# Altium PCB Lamps_board.PcbDoc (part 2 of 2)
Units mm, origin at the board's own origin, x right, y up, seen from the top; angles counter-clockwise.
Board outline 106 x 36 mm, 2 copper layers (Top Layer, Bottom Layer), stack 1.671 mm thick; 111 components, 90 nets, 292 pads, 89 vias.
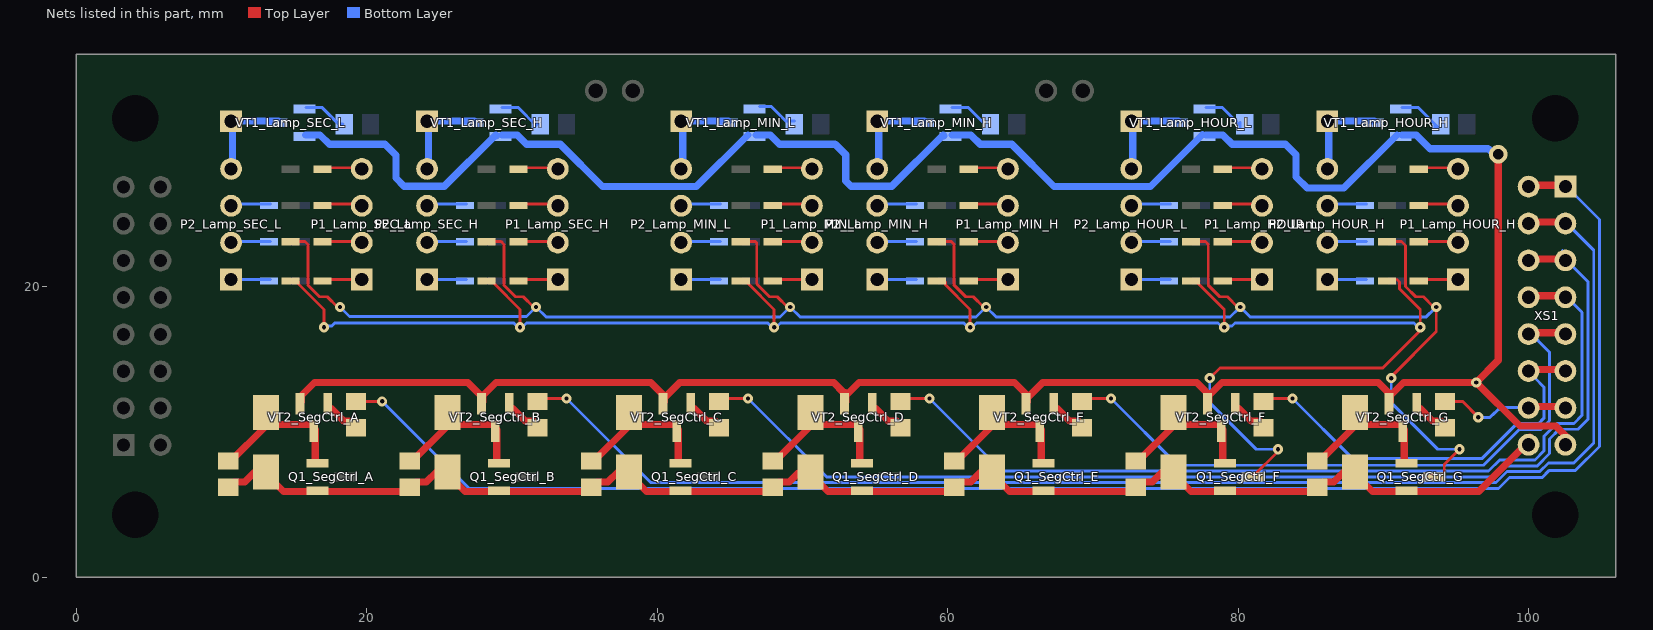
[diagram p2: the nets of this part, all layers, seen from the top]

## Via types
v1: diameter 0.7, hole 0.3, Top Layer to Bottom Layer, 88 vias
v2: diameter 1.27, hole 0.711, Top Layer to Bottom Layer, 1 vias

## Nets (pads, with @x,y where several pads share a name; then routed paths per layer and width w, separated by ;. In a path a pad name is that pad's centre, name@x,y a point inside that pad or via, vN(x,y) a via of type N, cw(c..) or ccw(c..) an arc to the next point about the centre after c; other vN are vias at no path point) (continued)
CTRL_F: D6_Lamp_HOUR_H.2 D6_Lamp_HOUR_L.2 D6_Lamp_MIN_H.2 D6_Lamp_MIN_L.2 D6_Lamp_SEC_H.2 D6_Lamp_SEC_L.2 Q1_SegCtrl_F.3 | length 125.9
  Top Layer w0.2: D6_Lamp_SEC_L.2@15.292,20.368 15.292,20.193 17.05,18.435 v1(17.05,17.21) ; D6_Lamp_SEC_H.2@28.735,20.425 28.735,20.25 30.55,18.435 v1(30.55,17.21) ; D6_Lamp_MIN_L.2@46.248,20.412 46.248,20.237 48.05,18.435 v1(48.05,17.21) ; D6_Lamp_MIN_H.2@59.85,20.31 59.85,20.135 61.55,18.435 v1(61.55,17.21) ; D6_Lamp_HOUR_L.2@77.212,20.388 D6_Lamp_HOUR_L.2@77.288,20.388 ; D6_Lamp_HOUR_L.2@77.314,20.388 D6_Lamp_HOUR_L.2@77.288,20.388 ; v1(78.05,13.71) 78.75,14.41 89.969,14.41 92.55,16.991 v1(92.55,17.21) 92.55,18.435 91.125,19.86 91.125,20.335 90.95,20.51 ; v1(79.05,17.21) 79.05,18.435 77.288,20.197 D6_Lamp_HOUR_L.2@77.288,20.388 ; Q1_SegCtrl_F.3@81.05,6.96 82.75,8.66 v1(82.75,8.81)
  Bottom Layer w0.2: v1(17.05,17.21) 17.146,17.306 17.58,17.306 17.784,17.51 30.115,17.51 v1@30.345,17.279 ; v1(30.55,17.21) 30.685,17.21 30.985,17.51 47.615,17.51 47.915,17.21 v1(48.05,17.21) 48.185,17.21 48.485,17.51 61.115,17.51 61.415,17.21 v1(61.55,17.21) 61.685,17.21 61.985,17.51 78.615,17.51 v1@78.819,17.306 ; v1(78.05,13.71) 78.05,12.01 81.25,8.81 v1(82.75,8.81) ; v1(79.05,17.21) 79.146,17.306 79.58,17.306 79.784,17.51 92.115,17.51 v1@92.345,17.279
CTRL_G: D7_Lamp_HOUR_H.2 D7_Lamp_HOUR_L.2 D7_Lamp_MIN_H.2 D7_Lamp_MIN_L.2 D7_Lamp_SEC_H.2 D7_Lamp_SEC_L.2 Q1_SegCtrl_G.3 | length 133.3
  Top Layer w0.2: D7_Lamp_SEC_L.2@15.25,23.21 15.35,23.11 15.75,23.11 15.95,22.91 15.95,20.101 16.741,19.31 17.269,19.31 17.969,18.61 v1(18.15,18.61) ; D7_Lamp_SEC_H.2@28.75,23.21 28.85,23.11 29.25,23.11 29.45,22.91 29.45,20.101 30.241,19.31 30.769,19.31 31.469,18.61 v1(31.65,18.61) ; D7_Lamp_MIN_L.2@46.25,23.21 46.35,23.11 46.75,23.11 46.85,23.01 46.85,20.201 47.741,19.31 48.269,19.31 48.969,18.61 v1(49.15,18.61) ; D7_Lamp_MIN_H.2@59.75,23.21 59.85,23.11 60.25,23.11 60.45,22.91 60.45,20.101 61.241,19.31 61.769,19.31 62.469,18.61 v1(62.65,18.61) ; D7_Lamp_HOUR_L.2@77.25,23.21 77.35,23.11 77.75,23.11 77.95,22.91 77.95,20.101 78.741,19.31 79.269,19.31 79.969,18.61 v1(80.15,18.61) ; v1(90.55,13.71) 90.55,13.81 93.65,16.91 93.65,18.51 v1@93.75,18.61 ; D7_Lamp_HOUR_H.2@90.75,23.21 90.85,23.11 91.25,23.11 91.525,22.835 91.525,20.026 92.241,19.31 92.769,19.31 93.469,18.61 v1(93.65,18.61) ; Q1_SegCtrl_G.3@93.55,6.96 94,6.96 94.2,7.16 94.2,7.76 v1(95.25,8.81)
  Bottom Layer w0.2: v1(18.15,18.61) 18.8,17.96 31,17.96 v1@31.55,18.51 ; v1(31.65,18.61) 32.35,17.91 48.45,17.91 v1@49.05,18.51 ; v1(49.15,18.61) 49.85,17.91 61.95,17.91 v1(62.65,18.61) 63.35,17.91 79.45,17.91 v1@80.05,18.51 ; v1(80.15,18.61) 80.831,17.929 92.969,17.929 v1@93.55,18.51 ; v1(90.55,13.71) 90.55,12.01 93.75,8.81 v1(95.25,8.81)
CTRL_SEG_A: R2_SegCtrl_A.1 XS1.1 XS1.2 | length 111.2
  Top Layer w0.2: R2_SegCtrl_A.1@19.35,12.21 19.45,12.11 v1(21.05,12.11)
  Top Layer w0.5: XS1.2@100.123,27.001 XS1.1@102.463,27.001
  Bottom Layer w0.2: v1(21.05,12.11) 27.05,6.11 97.55,6.11 97.936,6.11 98.696,6.87 100.951,6.87 101.439,7.358 103.247,7.358 104.898,9.009 104.898,24.63 XS1.1@102.866,26.662 ; XS1.1@102.342,26.742 XS1.1@102.342,27.442 ; XS1.1@102.35,27.21 XS1.1@102.604,26.956
CTRL_SEG_B: R2_SegCtrl_B.1 XS1.3 XS1.4 | length 94.5
  Top Layer w0.2: R2_SegCtrl_B.1@31.85,12.21 31.95,12.31 v1(33.75,12.31)
  Top Layer w0.5: XS1.4@100.123,24.461 XS1.3@102.323,24.461
  Bottom Layer w0.2: v1(33.75,12.31) 39.55,6.51 97.77,6.51 98.53,7.27 100.786,7.27 101.382,7.866 103.12,7.866 104.498,9.244 104.498,22.522 102.644,24.376 XS1.3@102.612,24.376 ; XS1.3@102.382,24.892 XS1.3@102.382,24.996
CTRL_SEG_C: R2_SegCtrl_C.1 XS1.5 XS1.6 | length 78
  Top Layer w0.2: R2_SegCtrl_C.1@44.35,12.21 44.45,12.31 v1(46.25,12.31)
  Top Layer w0.5: XS1.6@100.123,21.921 XS1.5@102.363,21.921
  Bottom Layer w0.2: v1(46.25,12.31) 51.65,6.91 97.426,6.91 98.186,7.67 100.62,7.67 101.46,8.51 101.46,9.517 102.129,10.186 103.408,10.186 104.098,10.876 104.098,20.35 XS1.5@102.739,21.709 ; XS1.5@102.342,22.392 XS1.5@102.342,22.496
CTRL_SEG_D: R2_SegCtrl_D.1 XS1.7 XS1.8 | length 61.8
  Top Layer w0.2: R2_SegCtrl_D.1@56.85,12.21 56.95,12.31 v1(58.75,12.31)
  Top Layer w0.5: XS1.8@100.123,19.381 XS1.7@102.303,19.381
  Bottom Layer w0.2: v1(58.75,12.31) 63.75,7.31 97.26,7.31 98.02,8.07 100.445,8.07 101.06,8.685 101.06,9.683 101.963,10.586 103.136,10.586 103.698,11.148 103.698,18.242 102.898,19.042 XS1.7@102.866,19.042 ; XS1.7@102.242,19.642 XS1.7@102.442,19.642
CTRL_SEG_E: R2_SegCtrl_E.1 XS1.9 XS1.10 | length 44.6
  Top Layer w0.2: R2_SegCtrl_E.1@69.35,12.21 69.45,12.31 v1(71.25,12.31)
  Top Layer w0.5: XS1.10@100.123,16.841 XS1.9@102.503,16.841
  Bottom Layer w0.2: v1(71.25,12.31) 75.85,7.71 96.905,7.71 99.365,10.17 100.852,10.17 101.46,10.778 101.46,15.495 XS1.10@99.95,17.005
CTRL_SEG_F: R2_SegCtrl_F.1 XS1.11 XS1.12 | length 28.9
  Top Layer w0.2: R2_SegCtrl_F.1@81.85,12.21 81.95,12.31 v1(83.75,12.31)
  Top Layer w0.5: XS1.12@100.123,14.301 XS1.11@102.563,14.301
  Bottom Layer w0.2: v1(83.75,12.31) 87.9,8.16 96.789,8.16 99.199,10.57 100.686,10.57 101.06,10.944 101.06,13.101 100.478,13.683 XS1.12@100.478,14.197 ; XS1.12@99.742,14.642 XS1.12@99.742,14.742 ; XS1.12@100.224,14.451 XS1.12@100.478,14.197 ; XS1.12@100.478,14.546 XS1.12@100.478,14.197
CTRL_SEG_G: R2_SegCtrl_G.1 XS1.13 XS1.14 | length 8.8
  Top Layer w0.2: R2_SegCtrl_G.1@94.35,12.21 94.45,12.11 95.45,12.11 v1(96.55,11.01)
  Top Layer w0.5: XS1.14@100.123,11.761 XS1.13@102.623,11.761
  Bottom Layer w0.2: v1(96.55,11.01) 97.347,11.01 98.057,11.676 XS1.14@99.399,11.676 ; XS1.14@99.653,11.905 XS1.14@100.004,12.256
EXT_GND: VT1_Lamp_HOUR_H.2 VT1_Lamp_HOUR_L.2 VT1_Lamp_MIN_H.2 VT1_Lamp_MIN_L.2 VT1_Lamp_SEC_H.2 VT1_Lamp_SEC_L.2 VT2_SegCtrl_A.2 VT2_SegCtrl_B.2 VT2_SegCtrl_C.2 VT2_SegCtrl_D.2 VT2_SegCtrl_E.2 VT2_SegCtrl_F.2 VT2_SegCtrl_G.2 XS1.15 | length 211
  Top Layer w0.5: VT2_SegCtrl_A.2@15.5,12.06 15.5,12.51 16.4,13.41 26.95,13.41 VT2_SegCtrl_B.2@27.95,12.41 ; VT2_SegCtrl_B.2@28,12.06 28,12.51 28.9,13.41 39.55,13.41 VT2_SegCtrl_C.2@40.45,12.51 ; VT2_SegCtrl_C.2@40.5,12.06 40.5,12.36 41.55,13.41 52.15,13.41 52.85,12.71 52.95,12.71 ; VT2_SegCtrl_D.2@53,12.06 53,12.51 53.9,13.41 64.6,13.41 VT2_SegCtrl_E.2@65.5,12.51 ; VT2_SegCtrl_E.2@65.5,12.06 65.5,12.36 66.55,13.41 77.15,13.41 VT2_SegCtrl_F.2@77.95,12.61 ; VT2_SegCtrl_F.2@78,12.06 78,12.51 78.9,13.41 89.65,13.41 VT2_SegCtrl_G.2@90.45,12.61 ; VT2_SegCtrl_G.2@90.5,12.06 90.5,12.51 91.4,13.41 v1(96.41,13.41) ; v2(97.931,29.129) 97.931,14.931 v1(96.41,13.41) ; v2@98.078,29.176 98.178,29.276 v2@98.078,29.276 ; XS1.15@102.631,9.649 101.874,10.406 99.414,10.406 v1(96.41,13.41)
  Bottom Layer w0.5: VT1_Lamp_SEC_L.2@15.8,30.46 16.775,30.46 17.425,29.81 21.25,29.81 22,29.06 22,27.485 22.565,26.92 25.335,26.92 28.875,30.46 VT1_Lamp_SEC_H.2@28.925,30.41 ; VT1_Lamp_SEC_H.2@29.3,30.46 30.35,30.46 31,29.81 33.318,29.81 36.228,26.9 42.69,26.9 VT1_Lamp_MIN_L.2@46.25,30.46 ; VT1_Lamp_MIN_L.2@46.8,30.46 47.775,30.46 48.425,29.81 52.25,29.81 52.975,29.085 52.975,27.285 53.34,26.92 56.16,26.92 59.7,30.46 VT1_Lamp_MIN_H.2@59.75,30.41 ; VT1_Lamp_MIN_H.2@60.3,30.46 61.6,30.46 62.25,29.81 64.412,29.81 67.322,26.9 73.965,26.9 VT1_Lamp_HOUR_L.2@77.547,30.482 ; VT1_Lamp_HOUR_L.2@77.8,30.46 78.95,30.46 79.6,29.81 83.275,29.81 84,29.085 84,27.56 84.76,26.8 87.29,26.8 VT1_Lamp_HOUR_H.2@90.95,30.46 ; VT1_Lamp_HOUR_H.2@91.3,30.46 92.275,30.46 93.225,29.51 97.224,29.51 97.458,29.276 97.784,29.276 v2(97.931,29.129)
EXT_V: Q1_SegCtrl_A.2 Q1_SegCtrl_B.2 Q1_SegCtrl_C.2 Q1_SegCtrl_D.2 Q1_SegCtrl_E.2 Q1_SegCtrl_F.2 Q1_SegCtrl_G.2 R3_SegCtrl_A.2 R3_SegCtrl_B.2 R3_SegCtrl_C.2 R3_SegCtrl_D.2 R3_SegCtrl_E.2 R3_SegCtrl_F.2 R3_SegCtrl_G.2 VD1_SegCtrl_A.2 VD1_SegCtrl_B.2 VD1_SegCtrl_C.2 VD1_SegCtrl_D.2 VD1_SegCtrl_E.2 VD1_SegCtrl_F.2 VD1_SegCtrl_G.2 XS1.16 | length 88.4
  Top Layer w0.2: VD1_SegCtrl_G.2@88.125,7.235 88.1,7.21 88.075,7.21 88.075,7.235 VD1_SegCtrl_G.2@88.15,7.31
  Top Layer w0.5: R3_SegCtrl_A.2@10.55,6.21 10.9,6.56 11.6,6.56 12.25,7.21 VD1_SegCtrl_A.2@13.05,7.21 ; VD1_SegCtrl_A.2@13.65,6.41 13.75,6.41 14.26,5.9 22.44,5.9 R3_SegCtrl_B.2@22.55,6.01 ; R3_SegCtrl_B.2@23.05,6.21 23.4,6.56 24.1,6.56 24.825,7.285 VD1_SegCtrl_B.2@25.5,7.285 ; VD1_SegCtrl_B.2@26.15,6.41 26.25,6.41 26.76,5.9 34.94,5.9 R3_SegCtrl_C.2@35.05,6.01 ; R3_SegCtrl_C.2@35.55,6.21 35.9,6.56 36.6,6.56 37.325,7.285 VD1_SegCtrl_C.2@38.175,7.285 ; VD1_SegCtrl_C.2@38.65,6.41 38.75,6.41 39.26,5.9 47.44,5.9 R3_SegCtrl_D.2@47.55,6.01 ; R3_SegCtrl_D.2@48.05,6.21 48.4,6.56 49.1,6.56 49.7,7.16 VD1_SegCtrl_D.2@50.55,7.16 ; VD1_SegCtrl_D.2@51.15,6.41 51.25,6.41 51.76,5.9 59.84,5.9 R3_SegCtrl_E.2@59.95,6.01 ; R3_SegCtrl_E.2@60.55,6.21 60.9,6.56 61.6,6.56 62.225,7.185 VD1_SegCtrl_E.2@63.15,7.185 ; VD1_SegCtrl_E.2@63.65,6.41 63.75,6.41 64.26,5.9 72.44,5.9 R3_SegCtrl_F.2@72.55,6.01 ; R3_SegCtrl_F.2@73.05,6.21 73.4,6.56 74.1,6.56 VD1_SegCtrl_F.2@74.75,7.21 ; VD1_SegCtrl_F.2@76.15,6.41 76.25,6.41 76.76,5.9 84.94,5.9 R3_SegCtrl_G.2@85.05,6.01 ; R3_SegCtrl_G.2@85.55,6.21 85.9,6.56 86.6,6.56 87.425,7.385 VD1_SegCtrl_G.2@88.15,7.385 ; VD1_SegCtrl_G.2@88.65,6.41 88.75,6.41 89.26,5.9 96.582,5.9 100.091,9.409 XS1.16@100.091,9.649
NetD1_Lamp_HOUR_H_1: D1_Lamp_HOUR_H.1 P2_Lamp_HOUR_H.1 | length 2.4
  Bottom Layer w0.2: P2_Lamp_HOUR_H.1@86.45,20.41 86.55,20.51 D1_Lamp_HOUR_H.1@88.85,20.51
NetD1_Lamp_HOUR_L_1: D1_Lamp_HOUR_L.1 P2_Lamp_HOUR_L.1 | length 2.4
  Bottom Layer w0.2: P2_Lamp_HOUR_L.1@72.95,20.41 73.05,20.51 D1_Lamp_HOUR_L.1@75.35,20.51
NetD1_Lamp_MIN_H_1: D1_Lamp_MIN_H.1 P2_Lamp_MIN_H.1 | length 2.4
  Bottom Layer w0.2: P2_Lamp_MIN_H.1@55.45,20.41 55.55,20.51 D1_Lamp_MIN_H.1@57.85,20.51
NetD1_Lamp_MIN_L_1: D1_Lamp_MIN_L.1 P2_Lamp_MIN_L.1 | length 2.4
  Bottom Layer w0.2: P2_Lamp_MIN_L.1@41.95,20.41 42.05,20.51 D1_Lamp_MIN_L.1@44.35,20.51
NetD1_Lamp_SEC_H_1: D1_Lamp_SEC_H.1 P2_Lamp_SEC_H.1 | length 2.4
  Bottom Layer w0.2: P2_Lamp_SEC_H.1@24.45,20.41 24.55,20.51 D1_Lamp_SEC_H.1@26.85,20.51
NetD1_Lamp_SEC_L_1: D1_Lamp_SEC_L.1 P2_Lamp_SEC_L.1 | length 2.4
  Bottom Layer w0.2: P2_Lamp_SEC_L.1@10.95,20.41 11.05,20.51 D1_Lamp_SEC_L.1@13.35,20.51
NetD2_Lamp_HOUR_H_1: D2_Lamp_HOUR_H.1 P2_Lamp_HOUR_H.3 | length 2.4
  Bottom Layer w0.2: P2_Lamp_HOUR_H.3@86.45,25.71 86.47,25.69 88.83,25.69 D2_Lamp_HOUR_H.1@88.85,25.71
NetD2_Lamp_HOUR_L_1: D2_Lamp_HOUR_L.1 P2_Lamp_HOUR_L.3 | length 2.4
  Bottom Layer w0.2: P2_Lamp_HOUR_L.3@72.95,25.71 72.97,25.69 75.33,25.69 D2_Lamp_HOUR_L.1@75.35,25.71
NetD2_Lamp_MIN_H_1: D2_Lamp_MIN_H.1 P2_Lamp_MIN_H.3 | length 2.4
  Bottom Layer w0.2: P2_Lamp_MIN_H.3@55.45,25.71 55.47,25.69 57.83,25.69 D2_Lamp_MIN_H.1@57.85,25.71
NetD2_Lamp_MIN_L_1: D2_Lamp_MIN_L.1 P2_Lamp_MIN_L.3 | length 2.4
  Bottom Layer w0.2: P2_Lamp_MIN_L.3@41.95,25.71 41.97,25.69 44.33,25.69 D2_Lamp_MIN_L.1@44.35,25.71
NetD2_Lamp_SEC_H_1: D2_Lamp_SEC_H.1 P2_Lamp_SEC_H.3 | length 2.4
  Bottom Layer w0.2: P2_Lamp_SEC_H.3@24.45,25.71 24.47,25.69 26.83,25.69 D2_Lamp_SEC_H.1@26.85,25.71
NetD2_Lamp_SEC_L_1: D2_Lamp_SEC_L.1 P2_Lamp_SEC_L.3 | length 2.4
  Bottom Layer w0.2: P2_Lamp_SEC_L.3@10.95,25.71 10.97,25.69 13.33,25.69 D2_Lamp_SEC_L.1@13.35,25.71
NetD3_Lamp_HOUR_H_1: D3_Lamp_HOUR_H.1 P2_Lamp_HOUR_H.2 | length 2.1
  Bottom Layer w0.2: P2_Lamp_HOUR_H.2@86.75,23.21 86.84,23.12 88.84,23.12 D3_Lamp_HOUR_H.1@88.85,23.11
NetD3_Lamp_HOUR_L_1: D3_Lamp_HOUR_L.1 P2_Lamp_HOUR_L.2 | length 2.1
  Bottom Layer w0.2: P2_Lamp_HOUR_L.2@73.25,23.21 73.34,23.12 75.34,23.12 D3_Lamp_HOUR_L.1@75.35,23.11
NetD3_Lamp_MIN_H_1: D3_Lamp_MIN_H.1 P2_Lamp_MIN_H.2 | length 2.1
  Bottom Layer w0.2: P2_Lamp_MIN_H.2@55.75,23.21 55.84,23.12 57.84,23.12 D3_Lamp_MIN_H.1@57.85,23.11
NetD3_Lamp_MIN_L_1: D3_Lamp_MIN_L.1 P2_Lamp_MIN_L.2 | length 2.1
  Bottom Layer w0.2: P2_Lamp_MIN_L.2@42.25,23.21 42.34,23.12 44.34,23.12 D3_Lamp_MIN_L.1@44.35,23.11
NetD3_Lamp_SEC_H_1: D3_Lamp_SEC_H.1 P2_Lamp_SEC_H.2 | length 2.1
  Bottom Layer w0.2: P2_Lamp_SEC_H.2@24.75,23.21 24.84,23.12 26.84,23.12 D3_Lamp_SEC_H.1@26.85,23.11
NetD3_Lamp_SEC_L_1: D3_Lamp_SEC_L.1 P2_Lamp_SEC_L.2 | length 2.1
  Bottom Layer w0.2: P2_Lamp_SEC_L.2@11.25,23.21 11.34,23.12 13.34,23.12 D3_Lamp_SEC_L.1@13.35,23.11
NetD4_Lamp_HOUR_H_1: D4_Lamp_HOUR_H.1 P1_Lamp_HOUR_H.3 | length 2.1
  Top Layer w0.2: D4_Lamp_HOUR_H.1@92.58,25.68 92.55,25.71 P1_Lamp_HOUR_H.3@94.55,25.71 ; P1_Lamp_HOUR_H.3@94.65,25.681 P1_Lamp_HOUR_H.3@94.65,25.71
NetD4_Lamp_HOUR_L_1: D4_Lamp_HOUR_L.1 P1_Lamp_HOUR_L.3 | length 2.1
  Top Layer w0.2: D4_Lamp_HOUR_L.1@79.08,25.68 79.05,25.71 P1_Lamp_HOUR_L.3@81.05,25.71 ; P1_Lamp_HOUR_L.3@81.15,25.681 P1_Lamp_HOUR_L.3@81.15,25.71
NetD4_Lamp_MIN_H_1: D4_Lamp_MIN_H.1 P1_Lamp_MIN_H.3 | length 2.1
  Top Layer w0.2: D4_Lamp_MIN_H.1@61.58,25.68 61.55,25.71 P1_Lamp_MIN_H.3@63.55,25.71 ; P1_Lamp_MIN_H.3@63.65,25.681 P1_Lamp_MIN_H.3@63.65,25.71
NetD4_Lamp_MIN_L_1: D4_Lamp_MIN_L.1 P1_Lamp_MIN_L.3 | length 2.1
  Top Layer w0.2: D4_Lamp_MIN_L.1@48.08,25.68 48.05,25.71 P1_Lamp_MIN_L.3@50.05,25.71 ; P1_Lamp_MIN_L.3@50.15,25.681 P1_Lamp_MIN_L.3@50.15,25.71
NetD4_Lamp_SEC_H_1: D4_Lamp_SEC_H.1 P1_Lamp_SEC_H.3 | length 2.1
  Top Layer w0.2: D4_Lamp_SEC_H.1@30.58,25.68 30.55,25.71 P1_Lamp_SEC_H.3@32.55,25.71 ; P1_Lamp_SEC_H.3@32.65,25.681 P1_Lamp_SEC_H.3@32.65,25.71
NetD4_Lamp_SEC_L_1: D4_Lamp_SEC_L.1 P1_Lamp_SEC_L.3 | length 2.1
  Top Layer w0.2: D4_Lamp_SEC_L.1@17.08,25.68 17.05,25.71 P1_Lamp_SEC_L.3@19.05,25.71 ; P1_Lamp_SEC_L.3@19.15,25.681 P1_Lamp_SEC_L.3@19.15,25.71
NetD5_Lamp_HOUR_H_1: D5_Lamp_HOUR_H.1 P1_Lamp_HOUR_H.4 | length 2.1
  Top Layer w0.2: D5_Lamp_HOUR_H.1@92.55,28.21 92.56,28.2 94.649,28.2 P1_Lamp_HOUR_H.4@94.65,28.21
NetD5_Lamp_HOUR_L_1: D5_Lamp_HOUR_L.1 P1_Lamp_HOUR_L.4 | length 2.1
  Top Layer w0.2: D5_Lamp_HOUR_L.1@79.05,28.21 79.06,28.2 P1_Lamp_HOUR_L.4@81.149,28.2 ; P1_Lamp_HOUR_L.4@81.15,28.201 P1_Lamp_HOUR_L.4@81.15,28.21
NetD5_Lamp_MIN_H_1: D5_Lamp_MIN_H.1 P1_Lamp_MIN_H.4 | length 2.1
  Top Layer w0.2: D5_Lamp_MIN_H.1@61.55,28.21 61.56,28.2 63.649,28.2 P1_Lamp_MIN_H.4@63.65,28.21
NetD5_Lamp_MIN_L_1: D5_Lamp_MIN_L.1 P1_Lamp_MIN_L.4 | length 2.1
  Top Layer w0.2: D5_Lamp_MIN_L.1@48.05,28.21 48.06,28.2 50.149,28.2 P1_Lamp_MIN_L.4@50.15,28.21
NetD5_Lamp_SEC_H_1: D5_Lamp_SEC_H.1 P1_Lamp_SEC_H.4 | length 2.1
  Top Layer w0.2: D5_Lamp_SEC_H.1@30.55,28.21 30.56,28.2 P1_Lamp_SEC_H.4@32.649,28.2 ; P1_Lamp_SEC_H.4@32.65,28.201 P1_Lamp_SEC_H.4@32.65,28.21
NetD5_Lamp_SEC_L_1: D5_Lamp_SEC_L.1 P1_Lamp_SEC_L.4 | length 2.1
  Top Layer w0.2: D5_Lamp_SEC_L.1@17.05,28.21 17.06,28.2 P1_Lamp_SEC_L.4@19.149,28.2 ; P1_Lamp_SEC_L.4@19.15,28.201 P1_Lamp_SEC_L.4@19.15,28.21
NetD6_Lamp_HOUR_H_1: D6_Lamp_HOUR_H.1 P1_Lamp_HOUR_H.1 | length 2.1
  Top Layer w0.2: D6_Lamp_HOUR_H.1@92.55,20.51 P1_Lamp_HOUR_H.1@94.65,20.51
NetD6_Lamp_HOUR_L_1: D6_Lamp_HOUR_L.1 P1_Lamp_HOUR_L.1 | length 2.1
  Top Layer w0.2: D6_Lamp_HOUR_L.1@79.05,20.51 P1_Lamp_HOUR_L.1@81.15,20.51
NetD6_Lamp_MIN_H_1: D6_Lamp_MIN_H.1 P1_Lamp_MIN_H.1 | length 2.1
  Top Layer w0.2: D6_Lamp_MIN_H.1@61.55,20.51 P1_Lamp_MIN_H.1@63.65,20.51
NetD6_Lamp_MIN_L_1: D6_Lamp_MIN_L.1 P1_Lamp_MIN_L.1 | length 2.1
  Top Layer w0.2: D6_Lamp_MIN_L.1@48.05,20.51 P1_Lamp_MIN_L.1@50.15,20.51
NetD6_Lamp_SEC_H_1: D6_Lamp_SEC_H.1 P1_Lamp_SEC_H.1 | length 2.1
  Top Layer w0.2: D6_Lamp_SEC_H.1@30.55,20.51 P1_Lamp_SEC_H.1@32.65,20.51
NetD6_Lamp_SEC_L_1: D6_Lamp_SEC_L.1 P1_Lamp_SEC_L.1 | length 2.1
  Top Layer w0.2: D6_Lamp_SEC_L.1@17.05,20.51 P1_Lamp_SEC_L.1@19.15,20.51
NetD7_Lamp_HOUR_H_1: D7_Lamp_HOUR_H.1 P1_Lamp_HOUR_H.2 | length 2.1
  Top Layer w0.2: D7_Lamp_HOUR_H.1@92.55,23.11 P1_Lamp_HOUR_H.2@94.65,23.11
NetD7_Lamp_HOUR_L_1: D7_Lamp_HOUR_L.1 P1_Lamp_HOUR_L.2 | length 2.1
  Top Layer w0.2: D7_Lamp_HOUR_L.1@79.05,23.11 P1_Lamp_HOUR_L.2@81.15,23.11
NetD7_Lamp_MIN_H_1: D7_Lamp_MIN_H.1 P1_Lamp_MIN_H.2 | length 2.1
  Top Layer w0.2: D7_Lamp_MIN_H.1@61.55,23.11 P1_Lamp_MIN_H.2@63.65,23.11
NetD7_Lamp_MIN_L_1: D7_Lamp_MIN_L.1 P1_Lamp_MIN_L.2 | length 2.1
  Top Layer w0.2: D7_Lamp_MIN_L.1@48.05,23.11 P1_Lamp_MIN_L.2@50.15,23.11
NetD7_Lamp_SEC_H_1: D7_Lamp_SEC_H.1 P1_Lamp_SEC_H.2 | length 2.1
  Top Layer w0.2: D7_Lamp_SEC_H.1@30.55,23.11 P1_Lamp_SEC_H.2@32.65,23.11
NetD7_Lamp_SEC_L_1: D7_Lamp_SEC_L.1 P1_Lamp_SEC_L.2 | length 2.1
  Top Layer w0.2: D7_Lamp_SEC_L.1@17.05,23.11 P1_Lamp_SEC_L.2@19.15,23.11
NetJ1_Lamp_HOUR_H_1: J1_Lamp_HOUR_H.1 P2_Lamp_HOUR_H.4 VT1_Lamp_HOUR_H.3 | length 6.4
  Bottom Layer w0.2: J1_Lamp_HOUR_H.1@86.15,31.51 J1_Lamp_HOUR_H.1@86.25,31.41 ; J1_Lamp_HOUR_H.1@86.35,31.51 J1_Lamp_HOUR_H.1@86.45,31.41
  Bottom Layer w0.5: P2_Lamp_HOUR_H.4@86.25,28.21 J1_Lamp_HOUR_H.1@86.25,31.41 ; J1_Lamp_HOUR_H.1@86.45,31.41 VT1_Lamp_HOUR_H.3@89.4,31.41
NetJ1_Lamp_HOUR_L_1: J1_Lamp_HOUR_L.1 P2_Lamp_HOUR_L.4 VT1_Lamp_HOUR_L.3 | length 6.4
  Bottom Layer w0.2: J1_Lamp_HOUR_L.1@72.65,31.51 J1_Lamp_HOUR_L.1@72.75,31.41 ; J1_Lamp_HOUR_L.1@72.85,31.51 J1_Lamp_HOUR_L.1@72.95,31.41
  Bottom Layer w0.5: P2_Lamp_HOUR_L.4@72.75,28.21 J1_Lamp_HOUR_L.1@72.75,31.41 ; J1_Lamp_HOUR_L.1@72.95,31.41 VT1_Lamp_HOUR_L.3@75.9,31.41
NetJ1_Lamp_MIN_H_1: J1_Lamp_MIN_H.1 P2_Lamp_MIN_H.4 VT1_Lamp_MIN_H.3 | length 6.4
  Bottom Layer w0.2: J1_Lamp_MIN_H.1@55.15,31.51 J1_Lamp_MIN_H.1@55.25,31.41 ; J1_Lamp_MIN_H.1@55.35,31.51 J1_Lamp_MIN_H.1@55.45,31.41
  Bottom Layer w0.5: P2_Lamp_MIN_H.4@55.25,28.21 J1_Lamp_MIN_H.1@55.25,31.41 ; J1_Lamp_MIN_H.1@55.45,31.41 VT1_Lamp_MIN_H.3@58.4,31.41
NetJ1_Lamp_MIN_L_1: J1_Lamp_MIN_L.1 P2_Lamp_MIN_L.4 VT1_Lamp_MIN_L.3 | length 6.4
  Bottom Layer w0.2: J1_Lamp_MIN_L.1@41.65,31.51 J1_Lamp_MIN_L.1@41.75,31.41 ; J1_Lamp_MIN_L.1@41.85,31.51 J1_Lamp_MIN_L.1@41.95,31.41
  Bottom Layer w0.5: P2_Lamp_MIN_L.4@41.75,28.21 J1_Lamp_MIN_L.1@41.75,31.41 ; J1_Lamp_MIN_L.1@41.95,31.41 VT1_Lamp_MIN_L.3@44.9,31.41
NetJ1_Lamp_SEC_H_1: J1_Lamp_SEC_H.1 P2_Lamp_SEC_H.4 VT1_Lamp_SEC_H.3 | length 6.1
  Bottom Layer w0.5: P2_Lamp_SEC_H.4@24.25,28.21 J1_Lamp_SEC_H.1@24.25,31.41 ; J1_Lamp_SEC_H.1@24.45,31.41 VT1_Lamp_SEC_H.3@27.4,31.41
NetJ1_Lamp_SEC_L_1: J1_Lamp_SEC_L.1 P2_Lamp_SEC_L.4 VT1_Lamp_SEC_L.3 | length 6.4
  Bottom Layer w0.2: J1_Lamp_SEC_L.1@10.65,31.51 J1_Lamp_SEC_L.1@10.75,31.41 ; J1_Lamp_SEC_L.1@10.85,31.51 J1_Lamp_SEC_L.1@10.95,31.41
  Bottom Layer w0.5: P2_Lamp_SEC_L.4@10.75,28.21 J1_Lamp_SEC_L.1@10.75,31.41 ; J1_Lamp_SEC_L.1@10.95,31.41 12.45,31.41 VT1_Lamp_SEC_L.3@13.9,31.41
NetQ1_SegCtrl_A_1: Q1_SegCtrl_A.1 R3_SegCtrl_A.1 VD1_SegCtrl_A.1 VT2_SegCtrl_A.3 | length 9.2
  Top Layer w0.5: R3_SegCtrl_A.1@10.55,8.01 10.65,8.01 VD1_SegCtrl_A.1@12.95,10.31 ; VD1_SegCtrl_A.1@13.05,11.11 13.15,11.21 13.15,11.16 13.8,10.51 VT2_SegCtrl_A.3@16.35,10.51 ; Q1_SegCtrl_A.1@16.45,8.01 VT2_SegCtrl_A.3@16.45,10.16
NetQ1_SegCtrl_B_1: Q1_SegCtrl_B.1 R3_SegCtrl_B.1 VD1_SegCtrl_B.1 VT2_SegCtrl_B.3 | length 9
  Top Layer w0.5: R3_SegCtrl_B.1@23.15,8.01 VD1_SegCtrl_B.1@25.45,10.31 ; VD1_SegCtrl_B.1@25.55,11.11 VD1_SegCtrl_B.1@25.65,11.21 ; VD1_SegCtrl_B.1@25.65,11.16 26.3,10.51 VT2_SegCtrl_B.3@28.85,10.51 ; Q1_SegCtrl_B.1@28.95,8.01 VT2_SegCtrl_B.3@28.95,10.16
NetQ1_SegCtrl_C_1: Q1_SegCtrl_C.1 R3_SegCtrl_C.1 VD1_SegCtrl_C.1 VT2_SegCtrl_C.3 | length 9
  Top Layer w0.5: R3_SegCtrl_C.1@35.65,8.01 VD1_SegCtrl_C.1@37.95,10.31 ; VD1_SegCtrl_C.1@38.05,11.11 VD1_SegCtrl_C.1@38.15,11.21 ; VD1_SegCtrl_C.1@38.15,11.16 38.8,10.51 VT2_SegCtrl_C.3@41.35,10.51 ; Q1_SegCtrl_C.1@41.45,8.01 VT2_SegCtrl_C.3@41.45,10.16
NetQ1_SegCtrl_D_1: Q1_SegCtrl_D.1 R3_SegCtrl_D.1 VD1_SegCtrl_D.1 VT2_SegCtrl_D.3 | length 9
  Top Layer w0.5: R3_SegCtrl_D.1@48.15,8.01 VD1_SegCtrl_D.1@50.45,10.31 ; VD1_SegCtrl_D.1@50.55,11.11 VD1_SegCtrl_D.1@50.65,11.21 ; VD1_SegCtrl_D.1@50.65,11.16 51.3,10.51 VT2_SegCtrl_D.3@53.85,10.51 ; Q1_SegCtrl_D.1@53.95,8.01 VT2_SegCtrl_D.3@53.95,10.16
NetQ1_SegCtrl_E_1: Q1_SegCtrl_E.1 R3_SegCtrl_E.1 VD1_SegCtrl_E.1 VT2_SegCtrl_E.3 | length 9
  Top Layer w0.5: R3_SegCtrl_E.1@60.65,8.01 VD1_SegCtrl_E.1@62.95,10.31 ; VD1_SegCtrl_E.1@63.05,11.11 VD1_SegCtrl_E.1@63.15,11.21 ; VD1_SegCtrl_E.1@63.15,11.16 63.8,10.51 VT2_SegCtrl_E.3@66.35,10.51 ; Q1_SegCtrl_E.1@66.45,8.01 VT2_SegCtrl_E.3@66.45,10.16
NetQ1_SegCtrl_F_1: Q1_SegCtrl_F.1 R3_SegCtrl_F.1 VD1_SegCtrl_F.1 VT2_SegCtrl_F.3 | length 9
  Top Layer w0.5: R3_SegCtrl_F.1@73.15,8.01 VD1_SegCtrl_F.1@75.45,10.31 ; VD1_SegCtrl_F.1@75.55,11.11 VD1_SegCtrl_F.1@75.65,11.21 ; VD1_SegCtrl_F.1@75.65,11.16 76.3,10.51 VT2_SegCtrl_F.3@78.85,10.51 ; Q1_SegCtrl_F.1@78.95,8.01 VT2_SegCtrl_F.3@78.95,10.16
NetQ1_SegCtrl_G_1: Q1_SegCtrl_G.1 R3_SegCtrl_G.1 VD1_SegCtrl_G.1 VT2_SegCtrl_G.3 | length 9
  Top Layer w0.5: R3_SegCtrl_G.1@85.65,8.01 VD1_SegCtrl_G.1@87.95,10.31 ; VD1_SegCtrl_G.1@88.05,11.11 VD1_SegCtrl_G.1@88.15,11.21 ; VD1_SegCtrl_G.1@88.15,11.16 88.8,10.51 VT2_SegCtrl_G.3@91.35,10.51 ; Q1_SegCtrl_G.1@91.45,8.01 VT2_SegCtrl_G.3@91.45,10.16
NetR1_Lamp_HOUR_H_2: R1_Lamp_HOUR_H.2 VT1_Lamp_HOUR_H.1 | length 3.4
  Bottom Layer w0.2: VT1_Lamp_HOUR_H.1@91.3,32.36 92.4,32.36 93.75,31.01 93.55,31.01 R1_Lamp_HOUR_H.2@93.55,31.21
NetR1_Lamp_HOUR_L_2: R1_Lamp_HOUR_L.2 VT1_Lamp_HOUR_L.1 | length 3.1
  Bottom Layer w0.2: VT1_Lamp_HOUR_L.1@77.8,32.36 78.9,32.36 80.05,31.21 80.15,31.11 R1_Lamp_HOUR_L.2@80.15,31.01 ; R1_Lamp_HOUR_L.2@80.15,31.21 R1_Lamp_HOUR_L.2@80.15,31.31
NetR1_Lamp_MIN_H_2: R1_Lamp_MIN_H.2 VT1_Lamp_MIN_H.1 | length 2.6
  Bottom Layer w0.2: VT1_Lamp_MIN_H.1@60.3,32.36 61.4,32.36 R1_Lamp_MIN_H.2@62.45,31.31
NetR1_Lamp_MIN_L_2: R1_Lamp_MIN_L.2 VT1_Lamp_MIN_L.1 | length 2.8
  Bottom Layer w0.2: VT1_Lamp_MIN_L.1@47.05,32.41 47.85,32.41 48.85,31.41 R1_Lamp_MIN_L.2@49.45,31.41
NetR1_Lamp_SEC_H_2: R1_Lamp_SEC_H.2 VT1_Lamp_SEC_H.1 | length 3.4
  Bottom Layer w0.2: VT1_Lamp_SEC_H.1@29.3,32.36 30.4,32.36 31.65,31.11 31.85,31.31 R1_Lamp_SEC_H.2@31.65,31.31
NetR1_Lamp_SEC_L_2: R1_Lamp_SEC_L.2 VT1_Lamp_SEC_L.1 | length 3.4
  Bottom Layer w0.2: VT1_Lamp_SEC_L.1@15.8,32.36 16.9,32.36 18.2,31.06 18.35,31.21 R1_Lamp_SEC_L.2@18.15,31.21
NetR2_SegCtrl_A_2: R2_SegCtrl_A.2 VT2_SegCtrl_A.1 | length 2.3
  Top Layer w0.5: VT2_SegCtrl_A.1@17.55,11.61 18.4,10.76 19,10.76 R2_SegCtrl_A.2@19.35,10.41
NetR2_SegCtrl_B_2: R2_SegCtrl_B.2 VT2_SegCtrl_B.1 | length 2.3
  Top Layer w0.5: VT2_SegCtrl_B.1@30.05,11.61 30.9,10.76 31.5,10.76 R2_SegCtrl_B.2@31.85,10.41
NetR2_SegCtrl_C_2: R2_SegCtrl_C.2 VT2_SegCtrl_C.1 | length 2.3
  Top Layer w0.5: VT2_SegCtrl_C.1@42.55,11.61 43.4,10.76 44,10.76 R2_SegCtrl_C.2@44.35,10.41
NetR2_SegCtrl_D_2: R2_SegCtrl_D.2 VT2_SegCtrl_D.1 | length 2.3
  Top Layer w0.5: VT2_SegCtrl_D.1@55.05,11.61 55.9,10.76 56.5,10.76 R2_SegCtrl_D.2@56.85,10.41
NetR2_SegCtrl_E_2: R2_SegCtrl_E.2 VT2_SegCtrl_E.1 | length 2.3
  Top Layer w0.5: VT2_SegCtrl_E.1@67.55,11.61 68.4,10.76 69,10.76 R2_SegCtrl_E.2@69.35,10.41
NetR2_SegCtrl_F_2: R2_SegCtrl_F.2 VT2_SegCtrl_F.1 | length 2.3
  Top Layer w0.5: VT2_SegCtrl_F.1@80.05,11.61 80.9,10.76 81.5,10.76 R2_SegCtrl_F.2@81.85,10.41
NetR2_SegCtrl_G_2: R2_SegCtrl_G.2 VT2_SegCtrl_G.1 | length 2.3
  Top Layer w0.5: VT2_SegCtrl_G.1@92.55,11.61 93.4,10.76 94,10.76 R2_SegCtrl_G.2@94.35,10.41
pads on no net: J1.1 J1.2 J2.1 J2.2 XS2.13 XS2.14 XS2.15 XS2.16

## Keep-outs
Keep-Out Layer:
  the board outline again, w0.2

## Silkscreen, mask and mechanical layers (free items; w line width, h text height)
Top Overlay:
  lines w0.2: 2.077,12.967 7.1,12.967 ; 2.077,15.467 7.1,15.467 ; 2.077,18.067 7.1,18.067 ; 2.077,20.567 7.1,20.567 ; 2.077,23.067 7.1,23.067 ; 2.1,10.4 7.1,10.4 ; 98.704,10.469 103.804,10.469 ; 98.704,12.969 103.804,12.969 ; 98.704,15.569 103.804,15.569 ; 98.704,18.069 103.804,18.069 ; 98.704,20.669 103.804,20.669 ; 98.704,23.169 103.804,23.169 ; 98.704,25.669 103.804,25.669 ; 101.352,7.942 101.352,10.469 ; 21.25,17.91 21.25,33.21 8.35,33.21 8.35,17.91 21.25,17.91 ; 21.25,17.91 21.25,17.91 ; 2.077,7.667 7.1,7.667 7.1,27.967 2.077,27.967 2.077,7.667 ; 9.35,4.91 20.65,4.91 20.65,14.21 9.35,14.21 9.35,4.91 ; 21.85,4.91 33.15,4.91 33.15,14.21 21.85,14.21 21.85,4.91 ; 21.85,17.91 21.85,33.21 34.75,33.21 34.75,17.91 21.85,17.91 ; 34.35,4.91 45.65,4.91 45.65,14.21 34.35,14.21 34.35,4.91 ; 39.35,17.91 39.35,33.21 52.25,33.21 52.25,17.91 39.35,17.91 ; 46.85,4.91 58.15,4.91 58.15,14.21 46.85,14.21 46.85,4.91 ; 52.85,17.91 52.85,33.21 65.75,33.21 65.75,17.91 52.85,17.91 ; 59.35,4.91 70.65,4.91 70.65,14.21 59.35,14.21 59.35,4.91 ; 70.35,17.91 70.35,33.21 83.25,33.21 83.25,17.91 70.35,17.91 ; 71.85,4.91 83.15,4.91 83.15,14.21 71.85,14.21 71.85,4.91 ; 83.85,17.91 83.85,33.21 96.75,33.21 96.75,17.91 83.85,17.91 ; 84.35,4.91 95.65,4.91 95.65,14.21 84.35,14.21 84.35,4.91 ; 98.704,7.866 98.704,27.969 98.704,28.237 103.804,28.237 103.804,27.969 103.804,7.866 98.704,7.866
  text "LAMP / SEC L" at 17.25,32.51 h2 r180
  text "LAMP / SEC H" at 30.75,32.51 h2 r180
  text "LAMP / MIN L" at 48.25,32.51 h2 r180
  text "LAMP / MIN H" at 61.75,32.51 h2 r180
  text "LAMP / HOUR L" at 80,32.51 h2 r180
  text "LAMP / HOUR H" at 93.6,32.51 h2 r180
  text "Digit Ctrl" at 21.55,31.91 h1.5 r180
  text "Digit Ctrl" at 35.05,31.91 h1.5 r180
  text "Digit Ctrl" at 52.55,31.91 h1.5 r180
  text "Digit Ctrl" at 66.05,31.91 h1.5 r180
  text "Digit Ctrl" at 83.55,31.91 h1.5 r180
  text "Digit Ctrl" at 97.05,31.91 h1.5 r180
  text "Segment Ctrl" at 104.4,27.9 h2 r270
  text "A" at 97.7,27.3 h1.5 r270
  text "B" at 97.7,24.7 h1.5 r270
  text "Digit Ctrl" at 1.6,24.4 h2 r90
  text "NONE" at 8.1,24.2 h1.5 r90
  text "C" at 97.7,22.3 h1.5 r270
  text "SEC L" at 1.6,20.6 h1.5 r90
  text "D" at 97.7,19.6 h1.5 r270
  text "SEC H" at 8.1,18 h1.5 r90
  text "E" at 97.7,17.1 h1.5 r270
  text "MIN L" at 1.7,15.7 h1.5 r90
  text "F" at 97.7,14.7 h1.5 r270
  text "Segment A" at 15.1,13.8 h1.5 r180
  text "Segment B" at 27.6,13.8 h1.5 r180
  text "Segment C" at 40.1,13.8 h1.5 r180
  text "Segment D" at 52.6,13.8 h1.5 r180
  text "Segment E" at 65.1,13.8 h1.5 r180
  text "Segment F" at 77.6,13.8 h1.5 r180
  text "Segment G" at 90.1,13.8 h1.5 r180
  text "MIN H" at 8.1,12.8 h1.5 r90
  text "G" at 97.7,12.2 h1.5 r270
  text "GND" at 104.1,10.2 h1.5 r270
  text "HOUR L" at 1.7,10 h1.5 r90
  text "+V" at 97.7,10 h1.5 r270
  text "HOUR H" at 8.1,6.5 h1.5 r90
Bottom Overlay:
  lines w0.2: 21.25,17.91 8.35,17.91 8.35,33.21 21.25,33.21 21.25,17.91 ; 21.25,17.91 21.25,17.91 ; 9.35,4.91 20.65,4.91 20.65,14.21 9.35,14.21 9.35,4.91 ; 21.85,4.91 33.15,4.91 33.15,14.21 21.85,14.21 21.85,4.91 ; 21.85,17.91 34.75,17.91 34.75,33.21 21.85,33.21 21.85,17.91 ; 34.35,4.91 45.65,4.91 45.65,14.21 34.35,14.21 34.35,4.91 ; 39.35,17.91 52.25,17.91 52.25,33.21 39.35,33.21 39.35,17.91 ; 46.85,4.91 58.15,4.91 58.15,14.21 46.85,14.21 46.85,4.91 ; 52.85,17.91 65.75,17.91 65.75,33.21 52.85,33.21 52.85,17.91 ; 59.35,4.91 70.65,4.91 70.65,14.21 59.35,14.21 59.35,4.91 ; 70.35,17.91 83.25,17.91 83.25,33.21 70.35,33.21 70.35,17.91 ; 71.85,4.91 83.15,4.91 83.15,14.21 71.85,14.21 71.85,4.91 ; 83.85,17.91 96.75,17.91 96.75,33.21 83.85,33.21 83.85,17.91 ; 84.35,4.91 95.65,4.91 95.65,14.21 84.35,14.21 84.35,4.91
  text "Digit Ctrl / SEC L" at 11.35,29.41 h1.5 r180
  text "Digit Ctrl / SEC H" at 24.35,29.41 h1.5 r180
  text "Digit Ctrl / MIN L" at 42.65,29.41 h1.5 r180
  text "Digit Ctrl / MIN H" at 55.75,29.41 h1.5 r180
  text "Digit Ctrl / HOUR L" at 73.45,29.41 h1.5 r180
  text "Digit Ctrl / HOUR H" at 86.85,29.41 h1.5 r180
  text "Segment Ctrl  A" at 9.65,12.91 h1.5 r180
  text "Segment Ctrl  B" at 22.15,12.91 h1.5 r180
  text "Segment Ctrl  C" at 34.65,12.91 h1.5 r180
  text "Segment Ctrl  D" at 47.15,12.91 h1.5 r180
  text "Segment Ctrl  E" at 59.65,12.91 h1.5 r180
  text "Segment Ctrl  F" at 72.15,12.91 h1.5 r180
  text "Segment Ctrl  G" at 84.65,12.91 h1.5 r180